# Altium PCB Tray_illumination_Board.PcbDoc
Units mm, origin at the board's own origin, x right, y up, seen from the top; angles counter-clockwise.
Board outline 30 x 50 mm, 2 copper layers (Top Layer, Bottom Layer), stack 1.448 mm thick; 7 components, 5 nets, 18 pads, 3 vias.
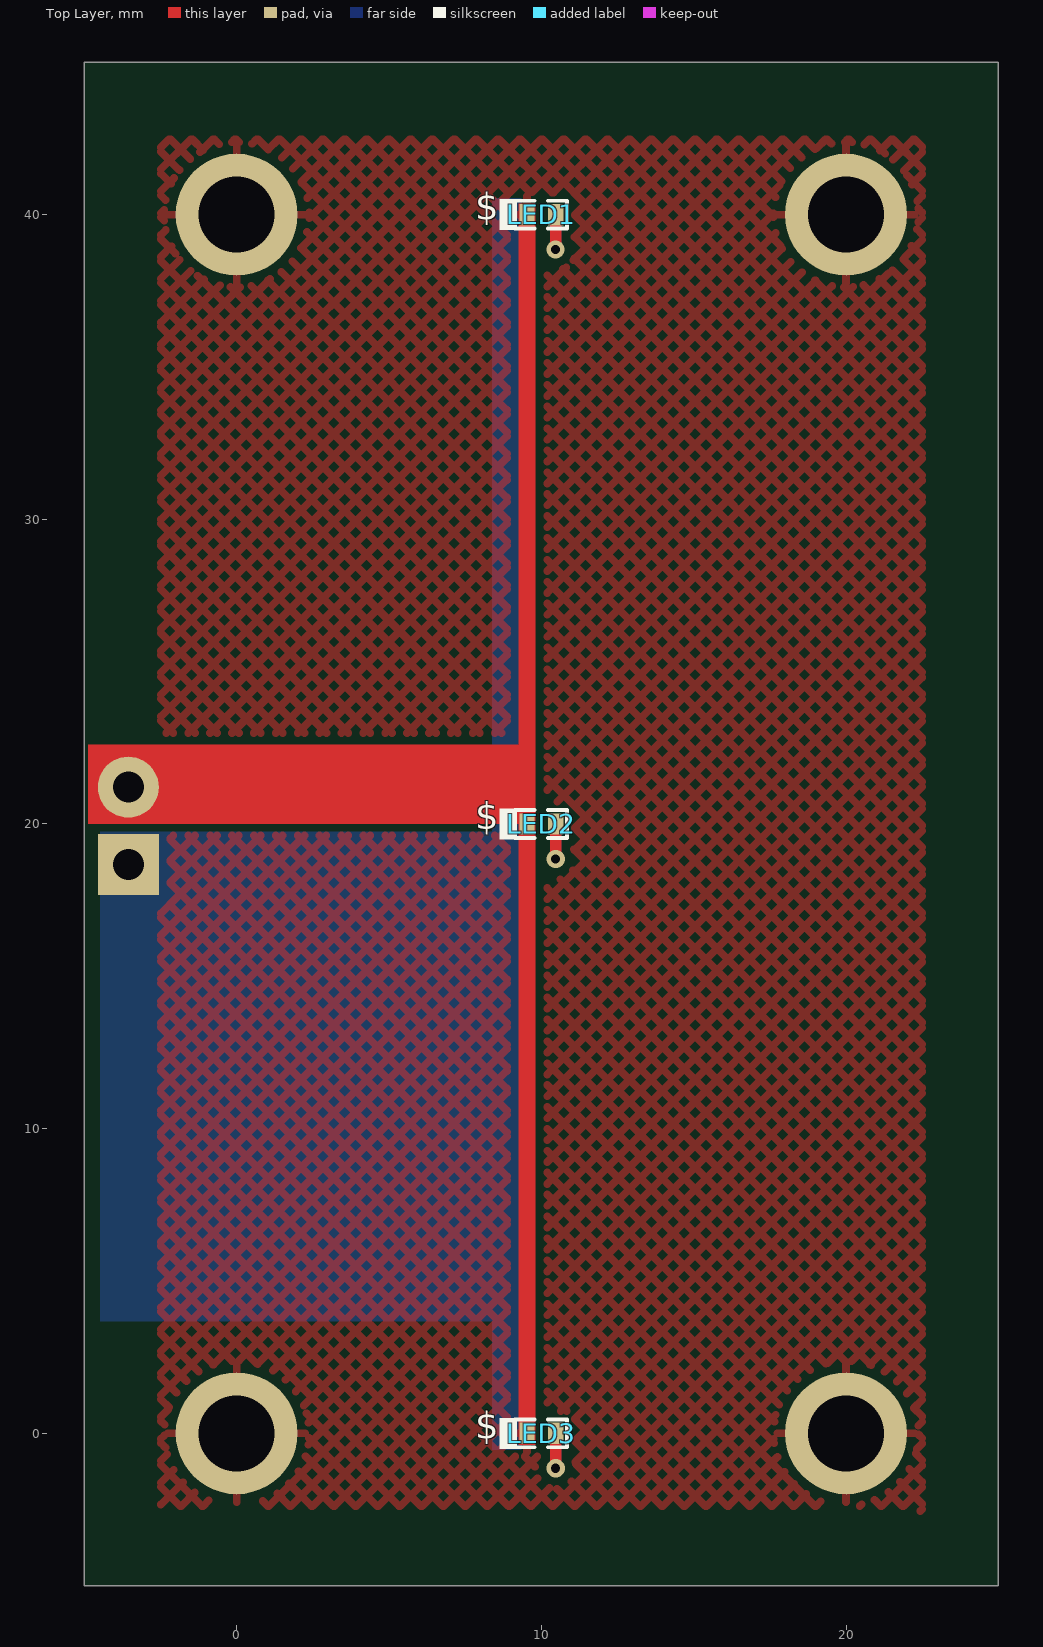
[diagram p0: Top Layer view]
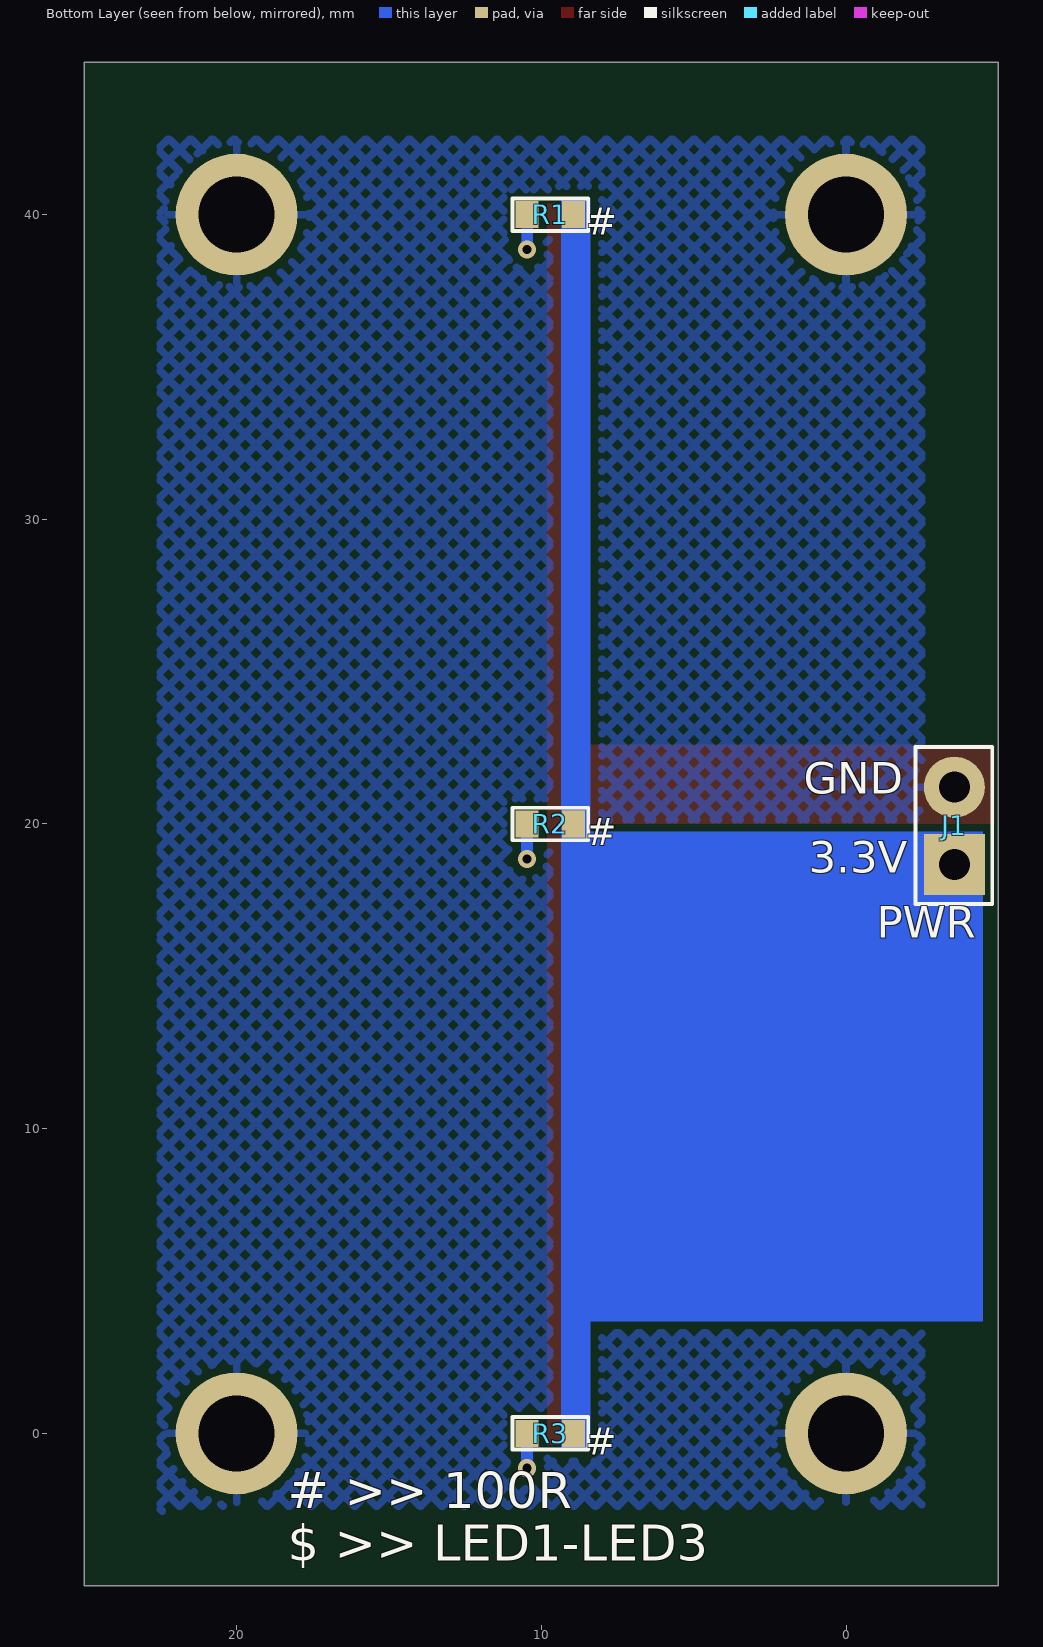
[diagram p1: Bottom Layer view, seen from below]
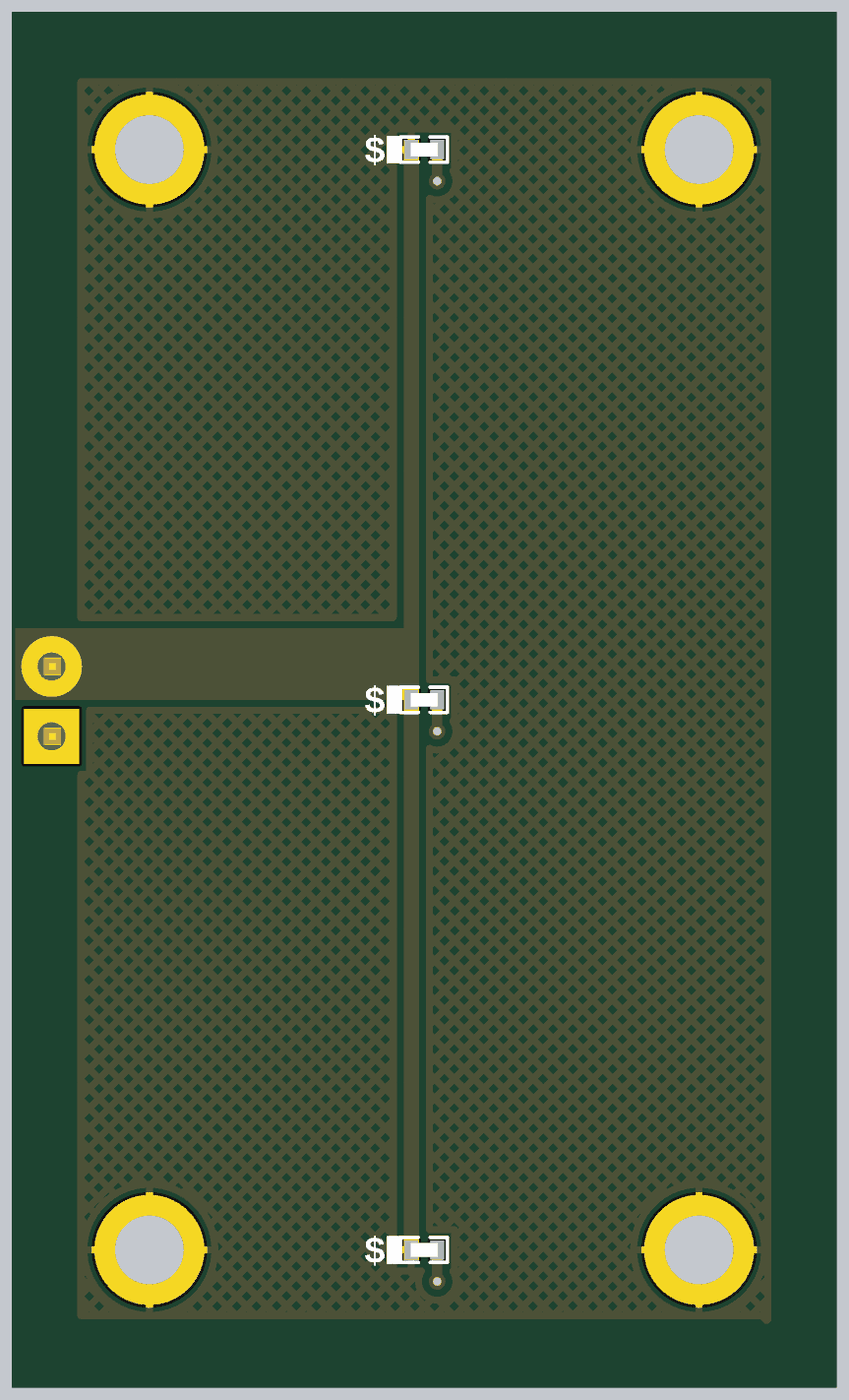
[diagram p2: 3D render of the assembled board from above, using the file's embedded part models]
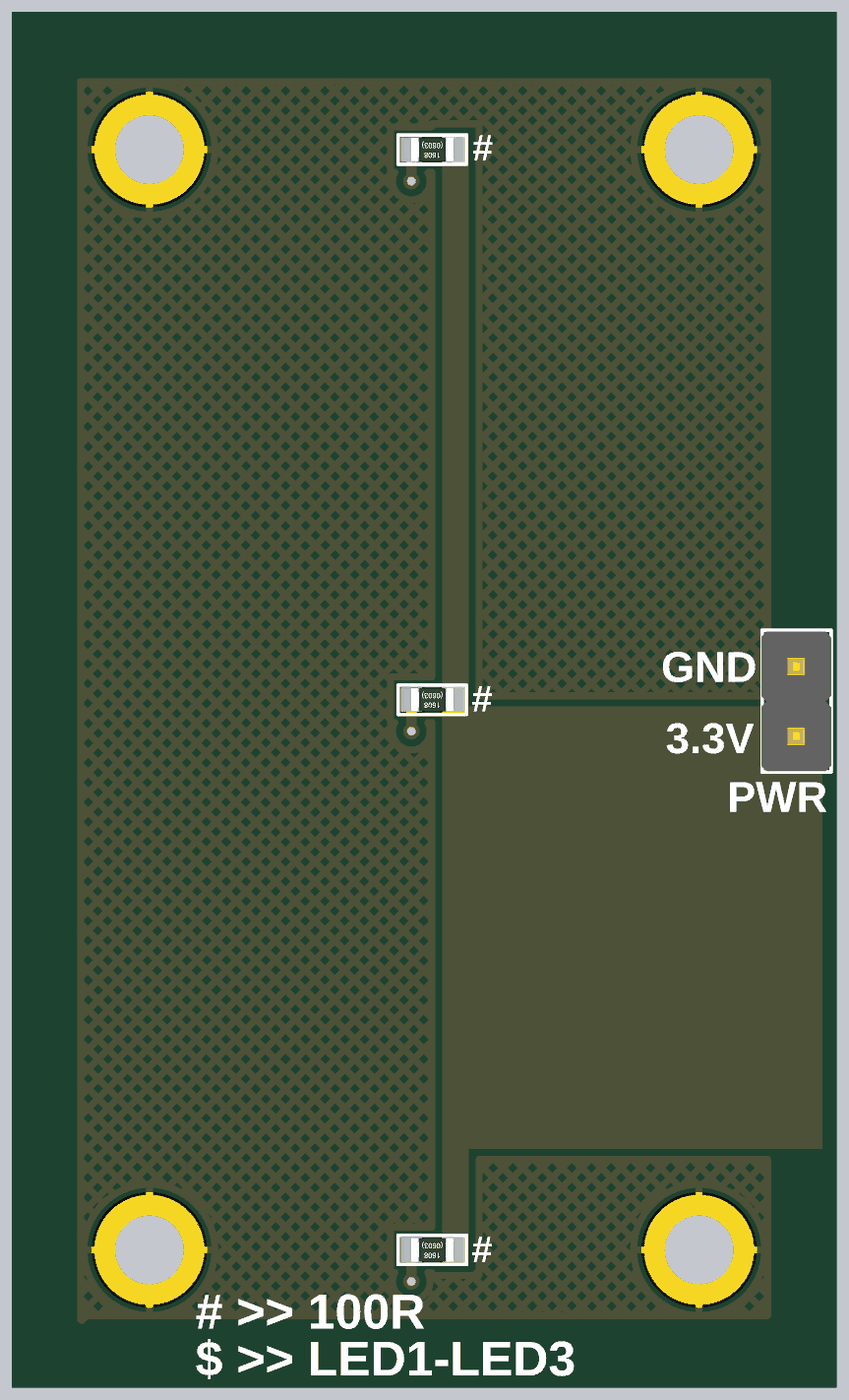
[diagram p3: 3D render of the assembled board from below, using the file's embedded part models]

## Layer stack, top to bottom
Top Solder: solder mask 0.0762, Solder Resist, Dk 3.5
Top Layer: signal copper 0.254
Dielectric 1: dielectric 0.9398, FR-4, Dk 4.8
Bottom Layer: signal copper 0.254
Bottom Solder: solder mask 0.0762, Solder Resist, Dk 3.5

## Board outline
-5,-5 -5,45 25,45 25,-5

## Design rules (kind name [scope] priority, off if disabled: settings)
Clearance [All] p1: gap=0.254 ignorepadtopadclearanceinfootprint=FALSE except(0: Arc-Hole Track-Hole SMDPad-Hole THPad-Hole Via-Hole Fill-Hole Poly-Hole Region-Hole Text-Hole)
HoleToHoleClearance [All] p1: gap=0 allowstackedmicrovias=TRUE
MinimumSolderMaskSliver [All] p1: minsoldermaskwidth=0
PolygonConnect [All] p1: connectstyle=Relief reliefconductorwidth=0.254 reliefentries=4 polygonreliefangle="90 Angle" airgapwidth=0.254
RoutingVias [All] p1: holewidth=0.3 width=0.6 viastyle="Through Hole" minholewidth=0.3 minwidth=0.6 maxholewidth=0.3 maxwidth=0.6
SilkToSilkClearance [All] p1: silktosilkclearance=0
SilkToSolderMaskClearance [IsPad] p1: minsilkscreentomaskgap=0 clearancetoexposedcopper=TRUE
SolderMaskExpansion [All] p1: expansion=0.102 istentingtop=FALSE
Width [All] p1: maxlimit=1.016 minlimit=0.254 preferedwidth=0.559
26 further rules are at their usual default settings.

## Components (designator, comment, footprint, x,y, rotation, side; value= is the part's Value field where it differs from the comment)
J1 "HDR_M_1X2" HDR_M_1X2 -3.556,19.939 r90 bottom
LED1 "SZYY0402W" "LED 0402" 10,40 r180 top
LED2 "SZYY0402W" "LED 0402" 10,20 r180 top
LED3 "SZYY0402W" "LED 0402" 10,0 r180 top
R1 "100R" RES-0603 9.707,40 r180 bottom
R2 "100R" RES-0603 9.707,20 r180 bottom
R3 "100R" RES-0603 9.707,0 r180 bottom

## Footprints (in the part's own frame and the unit in brackets; to place one, negate y for a bottom-side part, rotate by r counter-clockwise, add the part's x,y. Pads: shape width x height; smd on the part's side, far side on the other; paste and mask are expansions set on the pad)
HDR_M_1X2 [mm]
  rect 2x2 hole 1.02: 1(-1.27,0)
  round 2 hole 1.02: 2(1.27,0)
  silkscreen extent -2.57,-1.24 2.59,1.27, body extent -2.54,-1.24 2.54,1.3, height 11.93
"LED 0402" [mm] "LED BLUE CLEAR CHIP SMD"
  rect 0.5x0.7 smd: 1(-0.47,0) 2(0.47,0)
  silkscreen extent -0.84,-0.51 1.37,0.51, body extent -0.5,-0.25 0.5,0.25, height 0.5
RES-0603 [mil]
  rect 30x35 smd: 1(-30,0) 2(30,0)
  silkscreen extent -49,-21 49,21, body extent -31,-17 31,17, height 18

## Part data
J1: "2 POS 2.54mm spacer header", Current Rating=1A, Manufacturer=E-SIMPO, ComponentLink1Description=AliE, ComponentLink1URL=https://www.aliexpress.com/item/32896225776.html?spm=a2g0o.productlist.0.0.64116a18Q9OFX2&algo_pvid=aef74b9f-f029-40ba-a87b-4c3df7d87b26&algo_exp_id=aef74b9f-f029-40ba-a87b-4c3df7d87b26-3&pdp_ext_f=%7B%22sku_id%22%3A%2265850500267%22%7D&pdp_pi=-1%3B2.79%3B-1%3BUSD+3.72%40salePrice%3BUSD%3Bsearch-mainSearch, Pitch=2.54mm
LED1 LED2 LED3: "300mcd 2.8V Colorless transparence -40℃~+85℃ White light 16mW 0402 Light Emitting Diodes (LED) ROHS", Manufacturer="Yongyu Photoelectric", Manufacturer Part num=SZYY0402W
R1 R2 R3: library part RCA0603100RFKEAHP, "RES SMD 100 OHM 1% 1/4W 0603", Case Code (Imperial)=0603, Case Code (Metric)=1608, Manufacturer="Vishay Dale", Max Operating Temperature=155°C, Max Power Dissipation=250mW, Min Operating Temperature=-55°C, Resistor Type="Thick Film", Supplier Part Number 1=541-3244-2-ND, Temperature Coefficient=100ppm/°C, Tolerance=1%, Case/Package=0603, ComponentLink1Description=http://www.vishay.com/docs/20067/rcahp.pdf?src-supplier=Digi-Key, ComponentLink1URL=http://www.vishay.com/docs/20067/rcahp.pdf?src-supplier=Digi-Key, Features="Automotive AEC-Q200,Anti-Sulfur", Manufacturer Part Number=RCA0603100RFKEAHP, Number of Terminations=2, Packaging="Tape and Reel", Resistance=100R, RoHS Compliant=Yes, Stock 1=0, Supplier 1=Digi-Key

## Free pads (board coordinates)
  round 4 hole 2.5: MH1(20,40) MH2(0,40) MH3(20,0) MH4(0,0)

## Via types
v1: diameter 0.6, hole 0.3, Top Layer to Bottom Layer, tented both sides, 3 vias

## Nets (pads, with @x,y where several pads share a name; then routed paths per layer and width w, separated by ;. In a path a pad name is that pad's centre, name@x,y a point inside that pad or via, vN(x,y) a via of type N, cw(c..) or ccw(c..) an arc to the next point about the centre after c; other vN are vias at no path point)
GND: J1.2 LED1.2 LED2.2 LED3.2 pad.MH1 pad.MH2 pad.MH3 pad.MH4
NetLED1_1: LED1.1 R1.1 | length 2.3
  Top Layer w0.381: v1(10.469,38.853) 10.469,40 LED1.1
  Bottom Layer w0.381: v1(10.469,38.853) R1.1
NetLED2_1: LED2.1 R2.1 | length 2.3
  Top Layer w0.381: v1(10.47,18.853) LED2.1
  Bottom Layer w0.381: v1(10.47,18.853) R2.1@10.47,20
NetLED3_1: LED3.1 R3.1 | length 2.3
  Top Layer w0.381: v1(10.47,-1.147) LED3.1
  Bottom Layer w0.381: v1(10.47,-1.147) R3.1@10.47,0
VCC_3V3: J1.1 R1.2 R2.2 R3.2

## Polygon pours and split planes (outlines as drawn)
GND on Top Layer "Polygon_2" (hatched 45Degree grid 0.508 track 0.254, pour order 0): -2.469,42.469 -2.438,42.469 22.504,42.469 22.504,-2.515 22.454,-2.565 22.276,-2.388 -2.489,-2.388 -2.489,42.367 -2.489,42.469
GND on Bottom Layer "Polygon_1" (hatched 45Degree grid 0.508 track 0.254, pour order 1): -2.469,42.469 -2.438,42.469 22.504,42.469 22.504,-2.515 22.454,-2.565 22.276,-2.388 -2.489,-2.388 -2.489,42.367 -2.489,42.469

## Other copper
Top Layer:
  rectangle net GND: -4.877,20 9.53,22.606
  region net GND: 9.811,40.364 9.252,40.364 9.252,-0.381 9.811,-0.381
Bottom Layer:
  rectangle net VCC_3V3: -4.492,3.674 8.691,19.761
  rectangle net VCC_3V3: 8.386,-0.542 9.351,40.555

## Silkscreen, mask and mechanical layers (free items; w line width, h text height)
Top Overlay:
  text "$" at 7.827,39.531 h1.52
  text "$" at 7.827,19.531 h1.52
  text "$" at 7.827,-0.469 h1.52
Bottom Overlay:
  text "#" at 7.502,40.524 h1.52 r180
  text "GND" at 1.382,20.65 h1.78
  text "#" at 7.524,20.489 h1.52 r180
  text "3.3V" at 1.219,18.059 h1.78
  text "PWR" at -1.016,15.926 h1.78
  text "#" at 7.524,0.473 h1.52 r180
  text "# >> 100R" at 18.325,-2.859 h2.03
  text "$ >> LED1-LED3" at 18.325,-4.569 h2.03
Mechanical 1:
  lines w0.254: 25,0 25,20 25,40
Mechanical 2:
  the board outline again, w0.254

## Dimensions
0,40 to 20,40 on Mechanical 1
20,0 to 20,40 on Mechanical 1
25,45 to 25,-5 on Mechanical 1
-5,45 to 25,45 on Mechanical 1